# Altium PCB CH32X035F8U-R0.PcbDoc
Units mil, origin at the board's own origin, x right, y up, seen from the top; angles counter-clockwise.
Board outline 1850.39 x 1771.65 mil, 2 copper layers (Top Layer, Bottom Layer); 39 components, 35 nets, 161 pads, 318 vias.
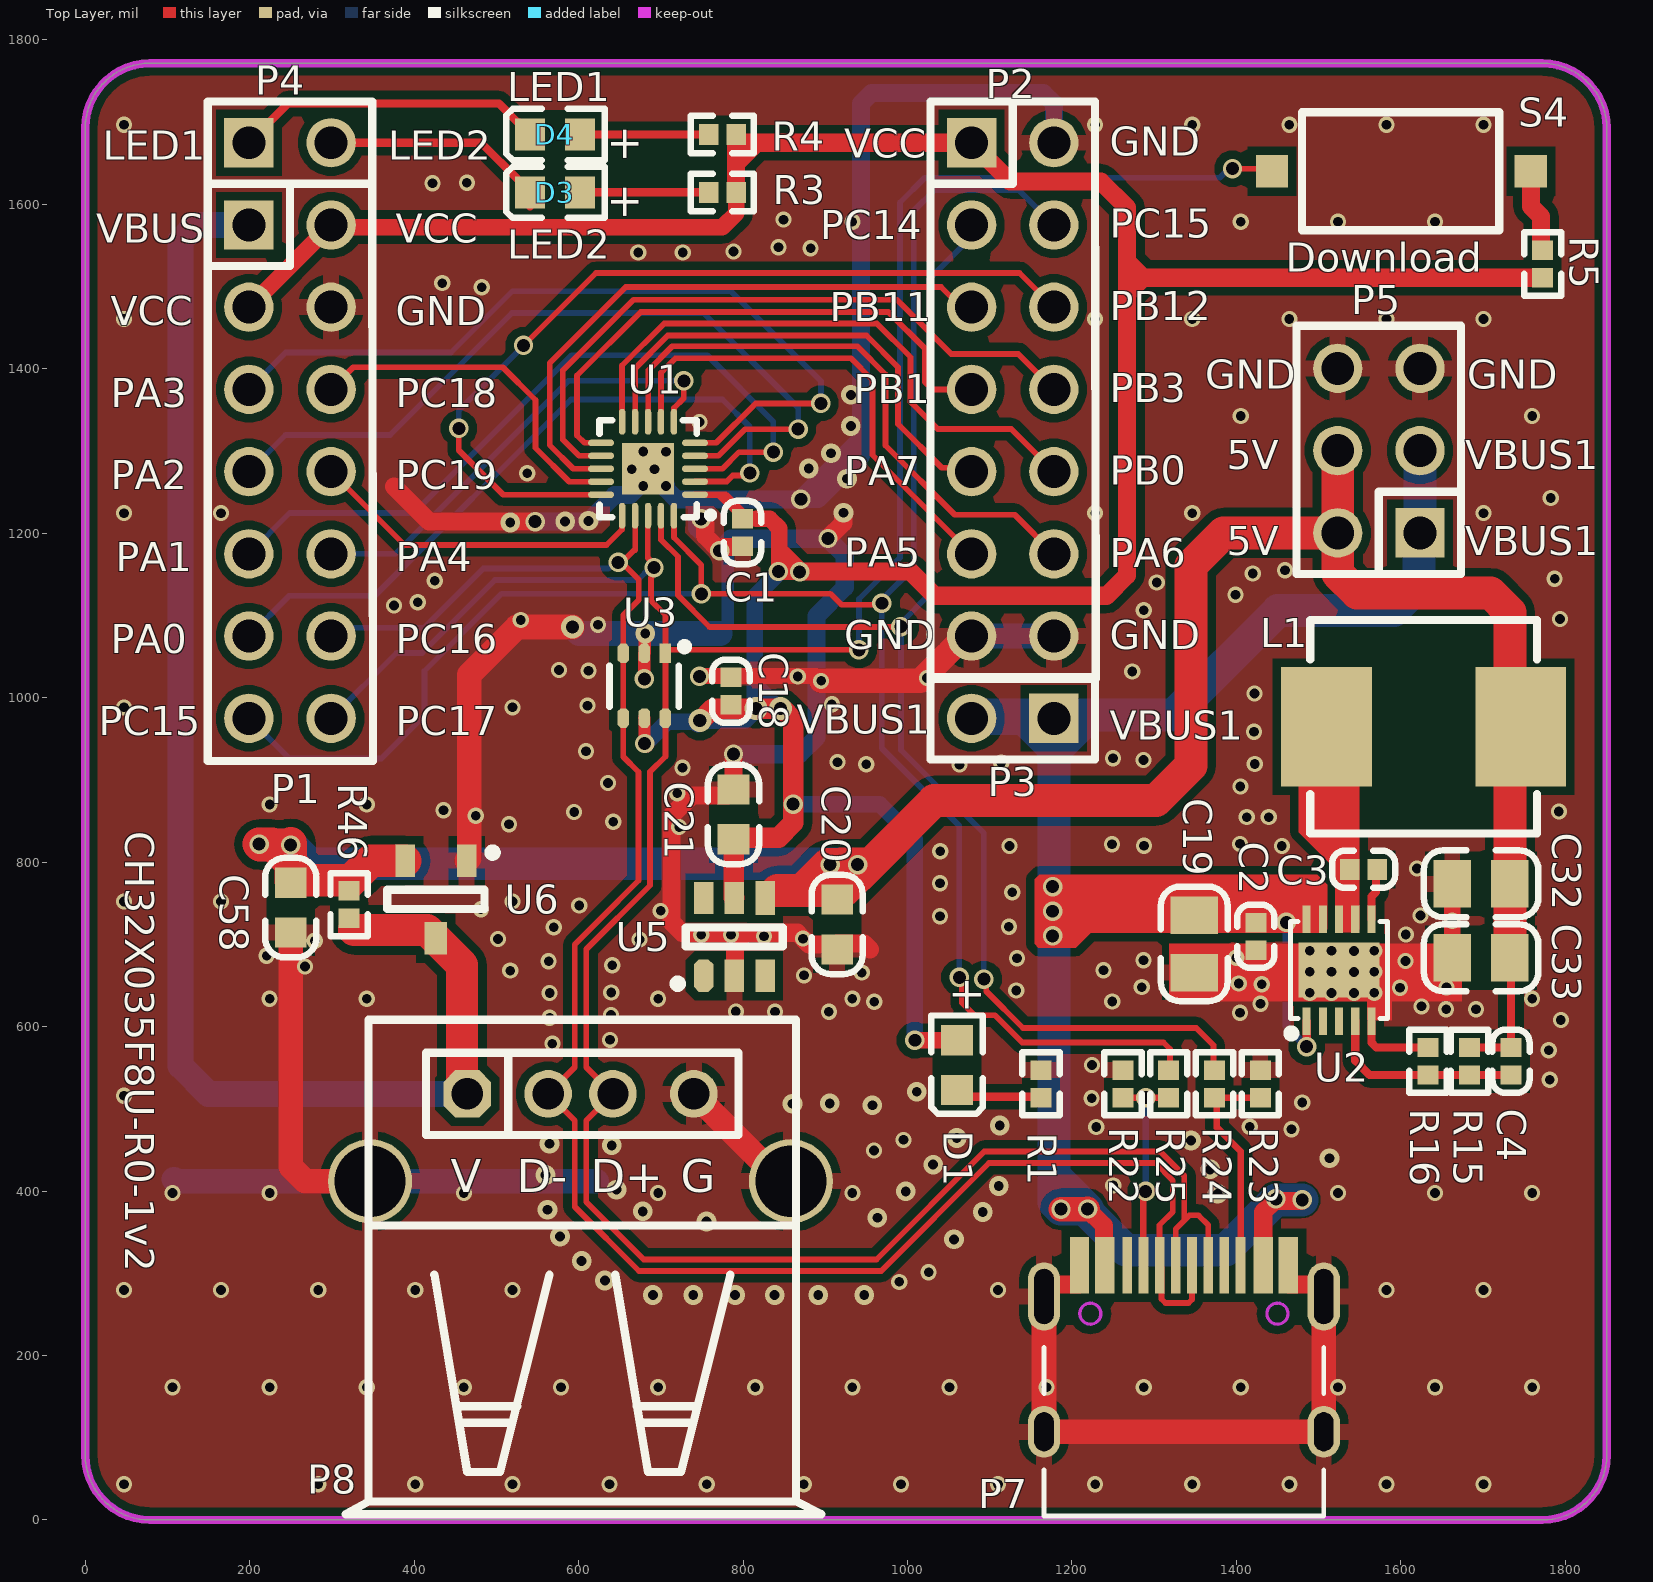
[diagram p0: Top Layer view]
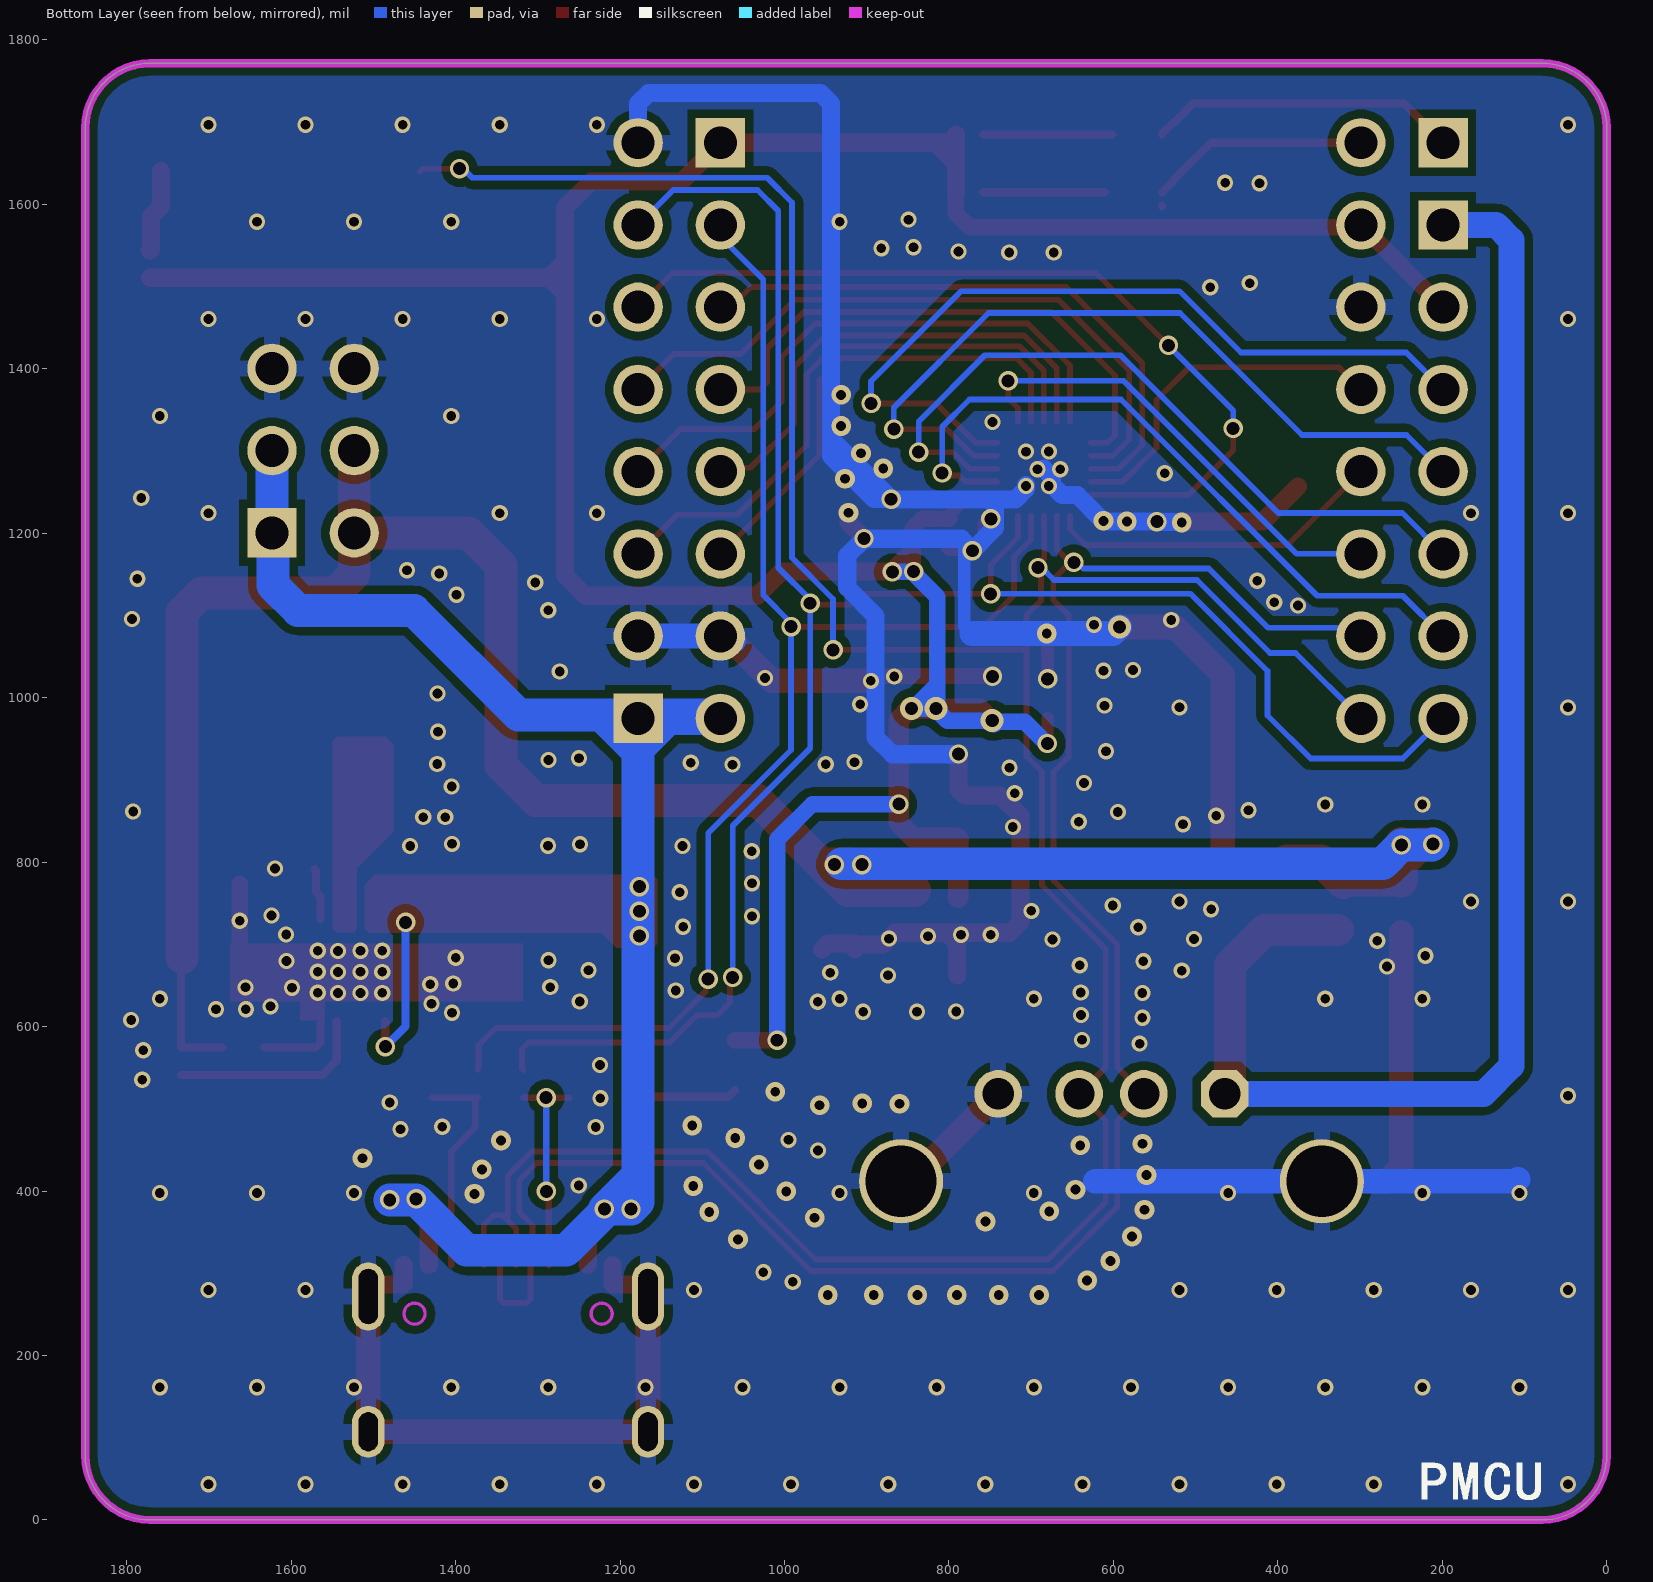
[diagram p1: Bottom Layer view, seen from below]

## Layer stack, top to bottom
Top Solder: solder mask 0.4, Solder Resist, Dk 3.5
Top Layer: signal copper 1.4
Dielectric1: dielectric 12.6, FR-4, Dk 4.8
Bottom Layer: signal copper 1.4
Bottom Solder: solder mask 0.4, Solder Resist, Dk 3.5

## Board outline
0,78.74 0,1692.91 cw(c78.74,1692.91) 78.74,1771.65 1771.65,1771.65 cw(c1771.65,1692.91) 1850.39,1692.91 1850.39,78.74 cw(c1771.65,78.74) 1771.65,0 78.74,0 cw(c78.74,78.74)

## Design rules (kind name [scope] priority, off if disabled: settings)
Clearance Clearance_1 [InPolygon] p1: gap=10 ignorepadtopadclearanceinfootprint=FALSE except(0: Arc-Hole Track-Hole SMDPad-Hole THPad-Hole Via-Hole Fill-Hole Poly-Hole Region-Hole Text-Hole)
Clearance [All] p2: gap=6 ignorepadtopadclearanceinfootprint=FALSE except(0: Arc-Hole Track-Hole SMDPad-Hole THPad-Hole Via-Hole Fill-Hole Poly-Hole Region-Hole Text-Hole)
ComponentClearance [All] p1 off: gap=10 collisioncheckmode=3 verticalgap=10 showdistances=FALSE
DiffPairsRouting [All] p1: maxlimit=10 minlimit=7 mostfreqgap=8 toplayer_minwidth=6 toplayer_maxwidth=15 toplayer_prefwidth=15 bottomlayer_minwidth=6 bottomlayer_maxwidth=15 bottomlayer_prefwidth=15 maxuncoupledlength=500
MinimumSolderMaskSliver [All] p1 off: minsoldermaskwidth=10
PolygonConnect PolygonConnect_1 [IsVia] p1: connectstyle=Direct reliefconductorwidth=10 reliefentries=4 polygonreliefangle="90 Angle" airgapwidth=10
PolygonConnect [All] p2: connectstyle=Relief reliefconductorwidth=20 reliefentries=4 polygonreliefangle="90 Angle" airgapwidth=10
RoutingVias [All] p1: holewidth=16 width=28 viastyle="Through Hole" minholewidth=11.81 minwidth=17.72 maxholewidth=28 maxwidth=50
SilkToSilkClearance [All] p1 off: silktosilkclearance=10
SilkToSolderMaskClearance [IsPad] p1 off: minsilkscreentomaskgap=10 clearancetoexposedcopper=TRUE
SolderMaskExpansion [All] p1: expansion=2 istentingtop=FALSE
Width [All] p1: maxlimit=100 minlimit=6 preferedwidth=10
25 further rules are at their usual default settings.

## Classes and differential pairs
differential pair NewDifferentialPair1: +PC17 -PC16

## Components (designator, comment, footprint, x,y, rotation, side; value= is the part's Value field where it differs from the comment)
C1 "0.1uF" 0402_C 799.3,1217.7 r0 top
C2 "NC(0.1uF)" 0402_C 1423.68,693.14 r180 top
C3 "NC(100nF)" 0402_C 1571.41,791.4 r270 top
C4 "NC(68pF)" 0402_C 1733.95,574.65 r0 top
C18 "0.1uF" 0402_C 785.24,1024.7 r0 top
C19 "NC(22uF/35V)" 0805_C 1348.71,665.62 r90 top
C20 "10uF" 0603_C 914.45,693.99 r90 top
C21 "10uF" 0603_C 788.4,888.48 r270 top
C32 "NC(22uF)" 0805_C 1662.54,773.73 r0 top
C33 "NC(22uF)" 0805_C 1662.54,683.73 r0 top
C58 "10uF" 0603_C 249.89,775.06 r270 top
D1 "RED" 0603+ 1060.26,583.43 r270 top
D3 "LED2" 0603+ 601.46,1614.6 r180 top
D4 "LED1" 0603+ 601.46,1685 r180 top
L1 "NC(4.7uH)" IND-SMD_L7.0-W6.6 1627.65,964.73 r0 top
P1 "Header 7X2" IDC14-2.54mm 199,1575 r0 top
P2 "Header 7X2" IDC14-2.54mm 1077.95,1675 r0 top
P3 "HEADER 2" SIP2-2.54mm 1177.95,975 r90 top
P4 "Header 2" SIP2-2.54mm 199,1675 r270 top
P5 "HEADER 3x2" IDC6-2.54mm 1623.23,1200.54 r90 top
P7 "TYPE-C" TYPE-C-Receptacle-2.0 1336.14,310 r0 top
P8 "USB_A" USBAF 464.51,518.31 r0 top
R1 "1K" 0402 1162.26,513.65 r90 top
R3 "1K" 0402 791.63,1614.6 r180 top
R4 "1K" 0402 791.63,1685 r180 top
R5 "4.7K" 0402 1772.46,1510.82 r90 top
R15 "NC(15K)" 0402 1683.45,541.18 r90 top
R16 "NC(4.7K)" 0402 1632.95,574.65 r270 top
R22 "5.1K" 0402 1261.97,513.65 r90 top
R23 "5.1K" 0402 1429.04,513.65 r90 top
R24 "0Ω" 0402 1373.35,547.11 r270 top
R25 "0Ω" 0402 1317.66,513.65 r90 top
R46 "NC(0Ω)" 0402 320.89,765.06 r270 top
S4 "Download" SMD_6.1x3.65x2.5mm-KEY 1758.21,1640.33 r180 top
U1 "CH32X035F8U6" QFN20_3X3 684.42,1278.5 r90 top
U2 "NC(CH2024Q)" DFN10_3X3 1524.85,668.74 r0 top
U3 "CH412K" SOT-363 705.57,1054.05 r180 top
U5 "CH2003K" SOT-23-6 751.94,662.03 r0 top
U6 "CH213" SOT-23-3 463.83,801.81 r180 top

## Footprints (in the part's own frame and the unit in brackets; to place one, negate y for a bottom-side part, rotate by r counter-clockwise, add the part's x,y. Pads: shape width x height; smd on the part's side, far side on the other; paste and mask are expansions set on the pad)
0402 [mm]
  rect 0.6x0.65 smd mask+0.051: 1(0,0) 2(0.85,0)
  silkscreen extent -0.55,-0.58 1.4,0.57
0402_C [mm]
  rect 0.65x0.6 smd mask+0.051: 1(0,0) 2(0,-0.85)
  silkscreen extent -0.58,-1.4 0.57,0.55
0603+ [mm]
  rect 0.93x0.98 smd: 1(0,0) 2(1.54,0)
  silkscreen extent -0.76,-0.79 2.27,0.79
0603_C [mm]
  rect 0.93x0.98 smd mask+0.051: 1(0,0) 2(1.54,0)
  silkscreen extent -0.76,-0.79 2.31,0.79
0805_C [mm]
  rect 1.16x1.47 smd mask+0.051: 1(0,0) 2(1.78,0)
  silkscreen extent -0.88,-1.04 2.66,1.03
DFN10_3X3 [mm]
  rect 2.5x1.7 smd mask+0.051: 0(0,0)
  rect 0.25x0.85 smd mask+0.051: 1(-1,-1.575) 2(-0.5,-1.575) 3(0,-1.575) 4(0.5,-1.575) 5(1,-1.575) 6(1,1.575) 7(0.5,1.575) 8(0,1.575) 9(-0.5,1.575) 10(-1,1.575)
  silkscreen extent -1.57,-2.05 1.5,1.5
IDC6-2.54mm [mil]
  rect 60x60 hole 40: 1(0,0)
  round 60 hole 40: 2(0,100) 3(100,0) 4(100,100) 5(200,0) 6(200,100)
  silkscreen extent -50,-50 252,150
IDC14-2.54mm [mil]
  rect 60x60 hole 40: 1(0,0)
  round 60 hole 40: 2(100,0) 3(0,-100) 4(100,-100) 5(0,-200) 6(100,-200) 7(0,-300) 8(100,-300) 9(0,-400) 10(100,-400) 11(0,-500) 12(100,-500) 13(0,-600) 14(100,-600)
  silkscreen extent -50,-652 151,50
IND-SMD_L7.0-W6.6 [mm]
  rect 2.8x3.7 smd: 1(-3,0) 2(3,0)
  silkscreen extent -3.5,-3.3 3.5,3.3
QFN20_3X3 [mm]
  rect 1.6x1.6 smd mask+0.051: 0(0,0)
  oval 0.2x0.8 smd mask+0.051: 1(-0.8,-1.451) 2(-0.4,-1.451) 3(0,-1.451) 4(0.4,-1.451) 5(0.8,-1.451) 11(0.8,1.451) 12(0.4,1.451) 13(0,1.451) 14(-0.4,1.451) 15(-0.8,1.451)
  oval 0.8x0.2 smd mask+0.051: 6(1.451,-0.8) 7(1.451,-0.4) 8(1.451,0) 9(1.451,0.4) 10(1.451,0.8) 16(-1.451,0.8) 17(-1.451,0.4) 18(-1.451,0) 19(-1.451,-0.4) 20(-1.451,-0.8)
  silkscreen extent -1.53,-2.03 1.5,1.5
SIP2-2.54mm [mil]
  rect 60x60 hole 40: 1(0,0)
  round 60 hole 40: 2(0,100)
  silkscreen extent -50,-50 50,150
SMD_6.1x3.65x2.5mm-KEY [mm]
  rect 1x1 smd: 1(0,0) 2(8,0)
  silkscreen extent 0.98,-1.83 7.08,1.83
SOT-23-3 [mm] "SOT-23-3"
  rect 0.6x1 smd: 1(0,0) 2(1.9,0)
  rect 0.7x1 smd: 3(0.95,2.4)
  silkscreen extent -0.93,-0.38 2.45,1.49
SOT-23-6 [mm] "SOT-23-6"
  oct 0.6x1 smd: 1(0,0)
  rect 0.6x1 smd: 2(0.95,0) 3(1.9,0) 5(0.95,2.4) 6(0,2.4)
  rect 0.6x1.04 smd: 4(1.9,2.4)
  silkscreen extent -0.93,-0.38 2.45,1.49
SOT-363 [mm]
  rect 0.35x0.6 smd mask+0.051: 1(0,0)
  oct 0.35x0.6 smd mask+0.051: 2(0.65,0) 3(1.3,0) 4(1.3,2) 5(0.65,2) 6(0,2)
  silkscreen extent -0.7,-0.31 1.73,1.65
TYPE-C-Receptacle-2.0 [mm]
  oval 1x1.6 hole 0.6 slot 1.2 at 90 deg: 0(-4.32,-5.15) 0(4.32,-5.15)
  oval 1x2.1 hole 0.6 slot 1.7 at 90 deg: 0(-4.32,-0.97) 0(4.32,-0.97)
  rect 0.6x1.75 smd mask+0.051: A1(-3.225,0) A4(-2.45,0) B1(3.225,0) B4(2.45,0)
  rect 0.3x1.75 smd mask+0.051: A5(-1.25,0) A6(-0.25,0) A7(0.25,0) A8(1.25,0) B5(1.75,0) B6(0.75,0) B7(-0.75,0) B8(-1.75,0)
  Keep-Out Layer circle w0.1: c-2.89,-1.5 r0.325
  Keep-Out Layer circle w0.1: c2.89,-1.5 r0.325
  silkscreen extent -4.32,-7.75 4.32,-2.55
USBAF [mm]
  round 2.6 hole 2.2: 0(-3,-2.7) 0(10,-2.7)
  oct 1.473x1.473 hole 0.965: 1(0,0)
  round 1.473 hole 0.965: 2(2.5,0) 3(4.5,0) 4(7,0)
  silkscreen extent -3.75,-12.99 10.95,2.29

## Part data
C1 C18: library part Cap, "Capacitor"
C2 C20 C21 C58: library part CAP, "Capacitor"
C3: library part "0603 1uF (105) 10% 50V", "贴片电容", Package=0603, SuppliersPartNumber=C15849, ComponentLink1Description=供应商链接, ComponentLink1URL=http://www.szlcsc.com/product/details_16531.html, Supplier=LC
C4 C19 C32 C33: library part "0603 100nF (104) 10% 50V", "贴片电容", Package=0603, SuppliersPartNumber=C14663, ComponentLink1Description=供应商链接, ComponentLink1URL=http://www.szlcsc.com/product/details_15331.html, Supplier=LC
D1 D3 D4: library part LED0, "Typical INFRARED GaAs LED", LatestRevisionDate=08-Jul-2005, LatestRevisionNote="Mech Layer 1 removed.", PackageReference=LED-0, Published=8-Jun-2000, Publisher="Altium Limited"
  D1: PackageDescription="LED; 2 Leads"
L1: library part INDUCTOR
P1 P2: "Header, 7-Pin, Dual row", LatestRevisionDate=17-Jul-2002, LatestRevisionNote="Re-released for DXP Platform.", Publisher="Altium Limited"
P3 P4: "Header, 2-Pin"
  P4: LatestRevisionDate=17-Jul-2002, LatestRevisionNote="Re-released for DXP Platform.", Publisher="Altium Limited"
P5: "Header, 3-Pin, Dual row"
P7: library part TYPE-C1
P8: library part USB, "USB Port"
R1 R15 R16 R46: library part RES
R3 R4: library part "Res Semi", "Semiconductor Resistor", LatestRevisionDate=17-Jul-2002, LatestRevisionNote="Re-released for DXP Platform.", PackageReference=AXIAL-0.5, Published=8-Jun-2000, Publisher="Altium Limited"
R5 R22 R23 R24 R25: library part Res2, "Resistor"
S4: library part KEY1
U1: "RISC-V MCU with USB/PD/ADC/SPI/I2C/UART/OA"
U2: library part CH2024Q, "Step-Down DC-DC Converter, 28V input, FB 1.2V, 3A output"
U3: "Qaud ESD protect, high speed"
U5: "Step-Down DC-DC Converter, 5V input, FB 0.6V, 800mA output, with LDO 3.3V * 200mA"
U6: library part CH213E, "Ideal Diode 5V*1A"

## Via types
v1: diameter 19.68, hole 11.81, Top Layer to Bottom Layer, tented both sides, 228 vias
v2: diameter 23.62, hole 15.75, Top Layer to Bottom Layer, tented both sides, 44 vias
v3: diameter 24, hole 12, Top Layer to Bottom Layer, tented both sides, 42 vias
v4: diameter 28, hole 16, Top Layer to Bottom Layer, tented both sides, 4 vias

## Nets (pads, with @x,y where several pads share a name; then routed paths per layer and width w, separated by ;. In a path a pad name is that pad's centre, name@x,y a point inside that pad or via, vN(x,y) a via of type N, cw(c..) or ccw(c..) an arc to the next point about the centre after c; other vN are vias at no path point)
3V3: C1.1 C18.2 C21.2 D1.1 P1.2 P1.3 P2.1 R3.1 R4.1 R5.1 U1.1 U3.5 U5.5 | length 4350.5
  Top Layer w8: C1.1 798.32,1217.7 790.51,1225.51 790.51,1226.49 770.06,1246.95 ; 815.92,1217.7 808.37,1217.7 779.12,1246.95 770.06,1246.95 ; 770.06,1246.95 769.99,1247.01 U1.1 741.61,1246.95 770.06,1246.95
  Top Layer w15: U3.5 680.14,975.15 680.14,944.55 v2(680.3,944.4)
  Top Layer w20: P1.3 P1.2 301.62,1572.38 774.94,1572.38 791.63,1589.08 R3.1 ; v2(680.3,944.4) v2@681.83,942.87 ; C1.1 C1.1@808.37,1217.7 ; 815.92,1217.7 832.54,1217.7 844.26,1205.98 844.26,1180.12 ; v4(845.69,986.83) v4@846.48,987.63 ; v2(1009.02,583.43) D1.1 ; 844.26,1180.12 870.89,1153.49 870.89,1153.04 870.62,1153.31 845.21,1153.31 844.26,1154.27 844.26,1180.12
  Top Layer w22: R3.1 791.63,1649.8 ; R4.1 791.63,1649.8 ; R4.1@800.65,1675 816.83,1675 ; 822.15,1675 816.83,1675 ; v2@870.89,1153.49 1003.81,1153.49 1033.31,1124 1242,1124 1267,1149 1267,1490.94 ; R5.1@1771.48,1510.82 1286.88,1510.82 ; 791.63,1649.8 816.83,1675 ; 816.83,1675 P2.1 1124.95,1628 1235.03,1628 1267,1596.03 1267,1530.7 ; 1267,1490.94 1267,1510.82 ; 1267,1490.94 1286.88,1510.82 ; 1267,1510.82 1267,1530.7 ; 1267,1510.82 1286.88,1510.82 ; 1267,1530.7 1286.88,1510.82
  Top Layer w25: v4(747.36,972.19) 748.44,972.19 763.09,986.83 v4(815.72,986.83) v4(845.69,986.83) 847.69,986.83 861.2,973.32 861.2,847.92 843.24,829.95 790.5,829.95 C21.2 788.87,827.38 788.87,756.99 U5.5
  Bottom Layer w20: v2(680.3,944.4) 681.28,944.4 707.54,970.66 745.83,970.66 v4(747.36,972.19) 802.28,972.19 814,983.9 814,1016.35 ; v4(815.72,986.83) v4@843.52,986.83 ; v4(845.69,986.83) v4@843.52,986.83 ; v2(860.87,870.54) 966.19,870.54 1009.02,827.71 v2(1009.02,583.43) ; v2@870.89,1153.04 v2(868.89,1153.04) 844.42,1153.04 814,1122.63 814,1016.35 ; 814,1016.35 v4@843.52,986.83
  Bottom Layer w25: v4@745.57,970.4 v4@745.83,970.66
  other v2: 842.95,1153.57
+5V: C4.1 C20.2 C32.2 C33.2 C58.1 L1.2 P5.2 P5.4 R15.2 R46.1 U5.4 U6.2 | length 3156.8
  Top Layer w10: R15.2 C4.1 1733.95,682.4 C33.2
  Top Layer w40: C58.1@249.89,777.06 C58.1@249.89,778.06 ; v2@249.89,822.79 v2@249.89,820.79 ; R46.1@320.55,775.06 347.3,801.81 U6.2 ; 320.55,778.06 270.75,778.06 ; 842.06,765.43 871.47,765.43 ; v2(939.43,797.13) 919.93,797.13 ; P5.2@1523.23,1196.71 1523.23,1150.8 1546.66,1127.37 1709.18,1127.37 1732.61,1103.94 C32.2 C33.2 ; P5.4 P5.2 1384.53,1200.54 1344.6,1160.61 1344.6,917.33 1302.14,874.87 1032.2,874.87 954.45,797.11 ; 227.91,820.9 249.89,798.92 ; 227.91,820.9 226.9,821.91 v2(211.41,821.91) 212.42,820.9 227.91,820.9 ; 227.91,820.9 v2(249.77,820.9) v2@249.89,820.79 ; C58.1@249.89,778.06 270.75,778.06 ; C58.1@249.89,778.06 249.89,798.92 ; 249.89,798.92 270.75,778.06 ; 249.89,798.92 v2@249.89,820.79 ; 871.47,765.43 903.17,797.13 919.93,797.13 ; 871.47,765.43 C20.2@900.88,765.43 ; C20.2@900.88,765.43 919.93,784.48 919.93,797.13 ; C20.2@900.88,765.43 922.76,765.43 954.45,797.11 ; 919.93,797.13 919.93,797.95 953.24,797.95 953.43,798.13 954.45,797.11
  Bottom Layer w40: v2(211.41,821.91) 212.42,820.9 v2(249.77,820.9) 272.54,798.13 v2@930.49,798.13
  other v2: 905.93,796.95
CC1: P2.3 R24.1 U1.19 | length 1737.5
  Top Layer w7: U1.19 700.17,1192.22 720.76,1171.62 720.76,1124.53 759.16,1086.14 991.66,1086.14 v2(991.95,1086.43) ; v2(1092.81,657.79) 1095.67,654.93 1095.67,643.09 1140.47,598.29 1351.17,598.29 1372.12,577.34 1372.12,548.34 R24.1
  Bottom Layer w7: P2.3 1077.95,1560.66 1025.7,1508.41 1025.7,1124.69 991.95,1090.93 991.95,936.5 1092.81,835.64 v2(1092.81,657.79)
CC2: P1.13 P2.4 R25.2 U1.20 | length 2540.9
  Top Layer w7: U1.20 715.91,1194.86 749.2,1161.57 v2(749.2,1126.24) ; v2@749.52,1126.56 906.49,1126.56 919.88,1113.17 966.96,1113.17 v2(968.72,1114.93) ; v2(1062.99,660) 1066.17,656.82 1066.17,629.15 1081.46,613.86 1106.51,613.86 1139.59,580.79 1311.43,580.79 1319.3,572.91 1319.3,548.75 R25.2
  Bottom Layer w7: P1.13 248,926 360,926 412.5,978.5 412.5,1032.69 506.37,1126.56 748.87,1126.56 v2(749.2,1126.24) ; v2(1062.99,660) 1062.99,844.24 968.72,938.5 968.72,1119.43 1007.48,1158.19 1007.48,1592.3 1032.74,1617.56 1135.4,1617.56 P2.4
FB: C4.2 R15.1 R16.2 U2.4 | length 244.7
  Top Layer w10: U2.4 1544.61,606.65 1544.61,558.56 1561.99,541.18 R15.1 C4.2
GND: C1.2 C2.1 C18.1 C19.1 C20.1 C21.1 C32.1 C33.1 C58.2 P1.4 P2.2 P2.13 P2.14 P5.5 P5.6 P7.0 P7.A1 P7.B1 P8.0 P8.4 R1.2 R16.1 R22.2 R23.2 U1.0 U2.0 U2.5 U3.2 U5.2 U6.1 | length 6045.2
  Top Layer w10: U2.5 1564.22,580.51 1570.08,574.65 R16.1
  Top Layer w15: v2@679.98,1026.05 U3.2 680.48,1054.55 680.48,1077.55 v3(680.98,1078.05)
  Top Layer w20: v2(747,1025.94) 747.5,1026.44 889.08,1026.44 v1(894.97,1020.56) ; C33.1 C32.1
  Top Layer w22: P1.4@305.22,1468.78 P1.4@305.22,1473.14 ; 375.66,1256.71 418.1,1214.27 v2(547.11,1214.27) ; v2(749.03,1217.54) 749.34,1217.23 749.34,1215.72 754.05,1211.01 754.05,1196.56 v2@771.28,1179.33 ; v2(771.42,1178.76) 771.42,1179.19 v2@771.28,1179.33 ; v2(788.4,931.58) C21.1 781.09,881.17 737.72,881.17 713.1,856.56 713.1,727.07 725.99,714.18 785.39,714.18 792.95,714.18 803.04,714.18 ; U5.2 790.15,662.84 790.15,701.29 792.95,704.09 803.04,714.18 ; C1.2 798.49,1183.42 775.37,1183.42 v2@771.28,1179.33 ; v2(903.3,1193.7) 903.3,1194.14 921.88,1212.72 921.88,1224.6 v3(922.26,1224.98) ; C20.1 908.5,699.94 880.13,699.94 865.89,714.18 803.04,714.18 ; C20.1@914.45,701.3 947.14,701.3 954.45,693.99 ; P7.0@1166.06,271.81 1166.06,278.53 1174.09,286.55 1208.36,286.55 1209.17,287.36 P7.A1 ; P7.B1 1463.11,287.36 1463.92,286.55 1498.2,286.55 1506.22,278.53 P7.0@1506.22,271.81
  Top Layer w30: C58.2 249.89,429.58 267.46,412.01 P8.0@346.4,412.01 ; U6.1 467.02,805 467.02,1027.98 525.17,1086.13 v4(592.38,1086.13) ; P8.4 846.4,412.01 P8.0@858.21,412.01 ; v1(894.97,1020.56) 1015.39,1020.56 1069.84,1075 P2.13 ; P7.0@1166.06,271.81 1166.06,107.24 1506.22,107.24 P7.0@1506.22,271.81
  Bottom Layer w15: 772.35,1078.05 781.53,1087.22 781.53,1189.31
  Bottom Layer w22: v3(516.83,1213) 517.37,1213 518.33,1213.96 546.8,1213.96 v2(547.11,1214.27) v3(583.65,1214.27) 611.89,1214.27 611.89,1214.57 643.93,1246.61 662.61,1246.61 674.61,1258.61 674.61,1268.7 v1@684.42,1278.5 ; v1@706.28,1258.41 706.28,1254.17 719.16,1241.29 743.82,1241.29 ; v2@749.03,1216.65 v2(749.03,1217.54) ; v2(771.42,1178.76) v2@771.42,1179.19 ; v2(788.4,931.58) 788.71,931.27 868.61,931.27 889.25,951.91 889.25,1099.55 923.69,1133.99 923.69,1172.87 903.3,1193.26 v2(903.3,1193.7) 902.99,1193.39 784.91,1193.39 781.53,1190.02 781.53,1189.31 v2@771.42,1179.19 ; P2.2 1177.95,1722.46 1165.07,1735.35 956.25,1735.35 943.37,1722.46 943.37,1314.47 ; 743.82,1241.29 870.18,1241.29 v2(870.32,1241.42) v2@870.63,1241.74 ; 743.82,1241.29 743.82,1206.79 v2@771.42,1179.19 ; v2@870.63,1241.74 943.37,1314.47 ; v2@870.63,1241.74 891.14,1241.74 943.37,1293.96 943.37,1314.47
  Bottom Layer w30: 108,414.46 110.45,412.01 346.4,412.01 621.99,412.01 ; v4(592.38,1086.13) 600.47,1078.05 v3(680.98,1078.05) 772.35,1078.05 ; P2.13@1061.93,1069.26 1072.21,1069.26 P2.13 P2.14
  other v1: 47.09,43.42 283.31,43.42 401.42,43.42 519.53,43.42 637.64,43.42 755.75,43.42 873.86,43.42 991.97,43.42 1110.08,43.42 1228.19,43.42 1346.3,43.42 1464.41,43.42 1582.52,43.42 1700.63,43.42 106.14,161.53 224.25,161.53 342.36,161.53 460.47,161.53 578.58,161.53 696.69,161.53 814.8,161.53 932.91,161.53 1051.02,161.53 1169.13,161.53 1287.24,161.53 1405.35,161.53 1523.46,161.53 1641.57,161.53 1759.68,161.53 47.09,279.64 165.2,279.64 283.31,279.64 401.42,279.64 519.53,279.64 1110.08,279.64 1582.52,279.64 1700.63,279.64 989.86,289.57 1025.69,301.32 106.14,397.76 224.25,397.76 460.47,397.76 696.69,397.76 932.91,397.76 1523.46,397.76 1641.57,397.76 1759.68,397.76 1250.14,406.71 959.31,449.37 995.14,462.3 1467.04,475.18 1229.48,477.91 1416.19,478.19 1479.97,507.67 1223.91,512.98 47.09,515.87 1780.99,535.45 1224.47,553.42 1779.98,571.21 568.1,579.34 638.08,583.89 1794.59,607.99 564.79,610.81 639.32,614.12 1404.41,616.98 791.27,618.47 838.76,618.02 904.35,618.02 1655.05,621.13 1691.52,621.13 1625.12,624.66 1429.18,627.89 959.53,630.23 1249.07,630.61 224.25,633.98 342.36,633.98 696.69,633.98 932.91,633.98 1759.68,633.98 564.79,641.04 639.74,641.45 1489.29,641.05 1515.75,641.05 1543.15,640.86 1567.71,641.24 1132.31,643.93 1599.09,647.23 1284.82,648.04 1655.56,647.8 1402.82,652.44 1430.77,651.53 874.04,662.35 944.45,665.68 1543.15,666.44 1489.29,666.63 1515.75,666.63 1567.71,666.82 516.79,668.12 1238.34,668.59 267.14,673.19 640.98,674.58 563.54,679.55 1605.7,679.92 1287.06,680.66 1133.07,683.11 1399.86,683.81 220.6,686.12 1489.29,692.21 1515.75,692.2 1543.15,692.02 1567.71,692.39 279.18,704.43 674.11,706.05 501.95,706.69 873.01,707.06 825.44,709.96 749.18,711.78 785.39,711.65 1606.08,712.05 569.76,720.96 1123.29,721.54 1662.54,728.73 1039.44,734.28 1623.84,735.1 699.78,740.83 481.14,742.74 600.81,747.46 47.09,752.09 165.2,752.09 519.53,752.09 1127.34,763.34 1039.44,774.39 1619.59,792.42 1039.72,813.36 1123.96,819.65 1287.5,820.11 1455.3,819.63 1248.62,821.89 1404.5,822.31 722.26,842.71 515.47,846.17 642.13,849.14 1412.52,854.84 1439.26,854.84 474.9,856.43 594.52,860.98 1792.16,861.78 435.66,863.11 224.25,870.2 342.36,870.2 719.99,883.91 1404.82,892.13 635.71,896.38 726.42,914.9 949.78,919.11 1063.31,918.65 1422.42,919.51 1113.94,920.87 914.97,921.7 1287,924.4 1249.85,926.35 608.87,934.93 1421.44,958.62 47.09,988.31 519.53,988.31 610.73,990.39 908.01,992.15 1421.93,1005.06 1023.76,1024.03 866.58,1025.86 1273.31,1031.95 611.98,1032.88 576.23,1033.86 623.64,1088.71 529.64,1094.51 1793.43,1095.86 1287.24,1106.42 375.46,1112.2 404.39,1116.24 1398.95,1125.32 1303.1,1140.1 425.03,1142.35 1787.03,1144.66 1419.97,1151.23 1459.08,1155.14 47.09,1224.53 165.2,1224.53 1228.19,1224.53 1346.3,1224.53 1700.63,1224.53 1782.23,1243.06 706.28,1257.41 678.44,1257.61 537.59,1273.06 664.53,1277.98 692.36,1277.98 706.28,1299.36 678.44,1299.56 747.05,1335.29 1405.35,1342.64 1759.68,1342.64 47.09,1460.75 1228.19,1460.75 1346.3,1460.75 1464.41,1460.75 1582.52,1460.75 1700.63,1460.75 482.28,1499.18 434.11,1504.25 726.69,1541.48 672.57,1541.61 788.3,1542.85 882.18,1546.73 843.17,1547.84 932.91,1578.86 1405.35,1578.86 1523.46,1578.86 1641.57,1578.86 849.31,1581.49 422.18,1625.64 464.1,1626.32 47.09,1696.97 1228.19,1696.97 1346.3,1696.97 1464.41,1696.97 1582.52,1696.97 1700.63,1696.97
  other v2: 679.98,1023.05
  other v3: 690.32,273.5 739.35,273.5 790.35,273.5 838.39,273.5 891.37,273.5 947.33,273.5 631.89,291.18 603.67,314.95 1056.64,341.32 577.42,344.66 755.66,363.11 963.34,367.62 677.94,375.33 1091.58,374.61 562.07,377.34 1376.91,396.61 997.86,399.68 646.16,401.73 1110.96,406.26 559.59,419.44 1368.03,426.43 1031.16,432.16 1513.11,440.02 640.26,455.67 564.55,457.57 1344.88,461.63 1059.93,464.63 1112.13,479.84 957.25,504.39 860.1,506.16 905.44,506.74 1011.25,520.81 611.89,1215.11 926.4,1266.31 879.97,1278.74 907.02,1297.38 931.06,1330.46 931.06,1368.37
LED1: D4.2 P4.1 | length 377.8
  Top Layer w10: P4.1 246.68,1722.68 503.15,1722.68 526.54,1699.29 527.52,1699.29 540.83,1685.98 D4.2
LED2: D3.2 P4.2 | length 268.4
  Top Layer w10: P4.2 481.41,1675 527.52,1628.89 527.52,1627.9 D3.2 ; D3.2@540.83,1597.6 D3.2@540.83,1598.58
NetC3_1: C3.1 U2.6 | length 63.6
  Top Layer w10: U2.6 1564.3,730.82 1564.3,758.22 1569.94,763.86 1569.94,789.93 C3.1
NetC3_2: C3.2 L1.1 U2.7 U2.8
NetD1_2: D1.2 R1.1 | length 105.8
  Top Layer w10: D1.2 1068.42,514.64 1161.27,514.64 R1.1
NetD3_1: D3.1 R3.2 | length 147.7
  Top Layer w10: D3.1@610.42,1614.77 R3.2@758.17,1614.77
NetD4_1: D4.1 R4.2 | length 156.7
  Top Layer w10: D4.1 R4.2
NetP7_A5: P7.A5 R22.1 R25.1 | length 260.5
  Top Layer w8: R22.1 v2(1289.81,513.65) R25.1 ; P7.A5 1286.93,396.97 v2(1289.71,399.75)
  Bottom Layer w8: v2(1289.71,399.75) 1289.76,399.81 v2(1289.81,513.65) v2(1289.81,513.65)
NetP7_B5: P7.B5 R23.1 R24.2 | length 269.3
  Top Layer w8: R24.2 R23.1 ; R24.2@1376.26,511.72 1376.26,477.26 1405.04,448.49 P7.B5
NetR5_2: R5.2 S4.1 | length 102.5
  Top Layer w22: S4.1 1758.21,1597.67 1770.67,1585.21 1770.67,1545.1 1771.48,1544.29 R5.2
PA0: P1.11 U1.2 | length 869.7
  Top Layer w7: U1.2 741.72,1262.92 780.09,1262.92 787.35,1270.18 805.09,1270.18 v2(808.27,1273.36)
  Bottom Layer w7: P1.11 248.13,1124.13 352.13,1124.13 590.86,1362.86 775.09,1362.86 808.27,1329.69 v2(808.27,1273.36)
PA1: P1.9 U1.3 | length 912.1
  Top Layer w7: U1.3 774.92,1278.5 795.14,1298.72 v2(836.82,1298.72)
  Bottom Layer w7: P1.9 248.55,1224.55 399.55,1224.55 591.43,1416.43 756.51,1416.43 836.82,1336.12 v2(836.82,1298.72)
PA2: P1.7 U1.4 | length 960.8
  Top Layer w7: U1.4 770.06,1294.25 802.43,1326.62 v2(867.03,1326.62)
  Bottom Layer w7: P1.7 243.5,1319.5 370.58,1319.5 519.11,1468.03 751.81,1468.03 867.03,1352.82 v2(867.03,1326.62)
PA3: P1.5 U1.5 | length 990.5
  Top Layer w7: U1.5 767.42,1310 815.41,1357.99 v2(894.7,1357.99)
  Bottom Layer w7: P1.5 243.89,1419.89 444.91,1419.89 519.54,1494.52 785.04,1494.52 894.7,1384.85 v2(894.7,1357.99)
PA4: P1.10 U1.6 | length 570.8
  Top Layer w7: U1.6 716.08,1335.8 716.08,1352.53 727.93,1364.38 v2(727.93,1385.39)
  Bottom Layer w7: P1.10 377,1175 587.39,1385.39 v2(727.93,1385.39)
PA5: P2.11 U1.7 | length 596.6
  Top Layer w7: U1.7 700.17,1395.35 717.67,1412.86 931.11,1412.86 957.57,1386.4 957.57,1295.39 P2.11
PA6: P2.12 U1.8 | length 723.4
  Top Layer w7: U1.8 684.58,1335.8 684.58,1398.16 713.91,1427.49 939.08,1427.49 973.29,1393.28 973.29,1306.72 1057.37,1222.64 1130.32,1222.64 P2.12
PA7: P2.9 U1.9 | length 599.8
  Top Layer w7: U1.9 668.84,1335.8 668.84,1400.8 708.53,1440.49 950.06,1440.49 988.52,1402.02 988.52,1332.87 1041.55,1279.84 1073.11,1279.84 P2.9
PB0: P2.10 U1.10 | length 721.1
  Top Layer w7: U1.10 652.92,1404.08 704.12,1455.28 962.6,1455.28 1003.62,1414.26 1003.62,1360.02 1036.75,1326.9 1126.06,1326.9 P2.10
PB1: P2.7 U1.11 | length 680.5
  Top Layer w7: U1.11 607.18,1310.01 598.13,1319.06 598.13,1391.88 675.49,1469.24 976.7,1469.24 1020.99,1424.96 1020.99,1384.28 1030.27,1375 P2.7
PB3: P2.8 U1.12 | length 816.9
  Top Layer w7: U1.12 600.36,1294.26 580.84,1313.77 580.84,1398.2 666.82,1484.18 987.26,1484.18 1053.28,1418.16 1134.79,1418.16 P2.8
PB11: P2.5 U1.13 | length 735.8
  Top Layer w7: U1.13 593.54,1278.51 564.76,1307.29 564.76,1406.9 657.4,1499.54 1040.9,1499.54 1065.44,1475 P2.5
PB12: P2.6 U1.15 | length 1051.5
  Top Layer w7: v2(454.33,1327.54) 454.33,1301.05 508.37,1247.02 U1.15 ; v2(532.93,1428.55) 621.03,1516.64 1136.31,1516.64 P2.6
  Bottom Layer w7: v2(454.33,1327.54) 454.33,1349.37 v2@531.47,1426.51
PC16: P1.12 P7.A7 P7.B7 P8.2 U1.17 U3.3 U3.4 | length 2378.6
  Top Layer w7: v2(648.02,1164.56) v2@652.51,1164.56 ; U1.17 668.84,1221.2 668.84,1208.77 668.88,1208.73 668.88,1179.81 667.77,1179.81 v2@652.51,1164.56 ; P7.A7 1345.98,268.06 1341.88,263.96 1313.71,263.96 1309.02,268.64 1309.02,307.59 P7.B7 1306.61,358.59 1322.58,374.56 1322.58,412.97 1301.53,434.02 1099.27,434.02 968.19,302.94 673.35,302.94 595.31,380.99 595.31,485.94 P8.2 595.31,550.68 595.31,699.95 624.15,728.79 672.98,777.62 672.98,909.64 654.39,928.23 U3.4 U3.3 654.39,1100.22 673.16,1119 673.16,1143.91 v2@652.51,1164.56
  Bottom Layer w7: P1.12 309.14,1085.14 411.81,1085.14 483.91,1157.25 636.21,1157.25 643.52,1164.56 v2(648.02,1164.56)
PC17: P1.14 P7.A6 P7.B6 P8.3 S4.2 U1.18 U3.1 U3.6 | length 3683.7
  Top Layer w7: U1.18 684.25,1221.2 684.25,1208.77 684.21,1208.73 684.21,1170.2 688.07,1166.33 691.73,1162.68 v2(691.73,1158.18) 688.55,1155 688.55,1146.17 688.07,1145.7 688.07,1118.01 705.57,1100.51 U3.1 U3.6 705.57,928.53 686.98,909.94 686.98,771.82 609.31,694.15 609.31,550.68 P8.3 609.31,485.94 609.31,386.79 679.15,316.94 962.39,316.94 1093.47,448.02 1307.33,448.02 1336.58,418.77 1336.58,379.01 1336.58,364.3 ; U3.1@705.57,1054.9 708.96,1058.29 v2(940.93,1058.29) ; P7.A6 1326.3,354.02 1336.58,364.3 ; P7.B6 1365.67,358.59 1353.78,370.48 1345.12,370.48 1342.76,370.48 1336.58,364.3 ; v2(1395.29,1643.46) 1440.11,1643.46 S4.2
  Bottom Layer w7: P1.14 378.48,1054.48 409.43,1054.48 498.2,1143.25 672.29,1143.25 687.23,1158.18 696.22,1158.18 v2@699.4,1161.36 ; v2(940.93,1058.29) 940.93,1120.21 990.93,1170.21 990.93,1602.2 1021.08,1632.35 1379.67,1632.35 1390.79,1643.46 v2(1395.29,1643.46)
PC18: P1.6 U1.14 | length 431.2
  Top Layer w7: P1.6 325.87,1401.87 507.87,1401.87 547.47,1362.27 547.47,1303.91 588.62,1262.76 U1.14
PC19: P1.8 U1.16 | length 415.2
  Top Layer w7: P1.8 388.13,1185.87 633.95,1185.87 652.75,1204.67 652.75,1221.2 U1.16
VBUS: P1.1 P8.1 R46.2 U6.3 | length 1765.6
  Top Layer w39.37: 327.34,717.56 415.55,717.56 458.17,674.95 458.17,524.65 P8.1
  Bottom Layer w31.5: P1.1 134.33,1575 115.88,1556.55 115.88,552.12 149.69,518.31 P8.1
VBUS1: C2.2 C19.2 P3.1 P3.2 P5.1 P5.3 P7.A4 P7.B4 U2.1 U2.9 U2.10 | length 2622.2
  Top Layer w10: v2(1460.79,726.78) 1460.79,734.39 v2@1460.79,734.51 ; v2(1485.48,575.7) U2.1
  Top Layer w22: v2@1218.97,377.75 1238.87,357.84 1238.87,310.81 P7.A4 ; P7.B4 1432.6,374.37 v2@1446.4,388.17 ; v2(1448.03,390.46) 1448.03,389.81 v2@1446.4,388.17 ; v2(1480.11,389.32) 1478.96,388.17 v2@1446.4,388.17
  Top Layer w30: v2@1186.68,377.75 1218.97,377.75 v2(1218.97,378.18)
  Top Layer w40: 1277.39,757.82 1300.82,734.39 1460.79,734.39 1471.71,734.39
  Bottom Layer w10: v2(1460.79,726.78) 1460.79,600.39 v2(1485.48,575.7)
  Bottom Layer w40: v2(1218.97,378.18) 1177.95,419.19 ; v2(1480.11,389.32) 1448.03,389.32 1386.75,328.04 1265.44,328.04 1215.51,377.97 v2(1186.68,377.97) 1177.95,386.7 1177.95,419.19 ; P5.3 P5.1 1622.13,1199.45 1622.13,1136.78 1591.52,1106.17 1450.78,1106.17 1323.44,978.83 1222.39,978.83 ; 1141.41,975 1177.95,938.46 ; 1141.41,975 P3.1 1177.95,938.46 ; 1141.41,975 P3.2 1081.78,978.83 1222.39,978.83 ; 1177.95,419.19 1177.95,934.39 ; 1177.95,934.39 1222.39,978.83 ; 1177.95,934.39 1177.95,938.46
  other v2: 1176.51,710.46 1176.51,740.36 1176.51,770.26
pads on no net: P7.A8 P7.B8 U2.2 U2.3 U5.1 U5.3 U5.6

## Polygon pours and split planes (outlines as drawn)
GND on Bottom Layer "GND" (solid, remove dead copper, pour order 1): 0,78.74 0,1692.91 cw(c78.74,1692.91) 78.74,1771.65 1771.65,1771.65 cw(c1771.65,1692.91) 1850.39,1692.91 1850.39,78.74 cw(c1771.65,78.74) 1771.65,0 78.74,0 cw(c78.74,78.74)
GND on Top Layer "GND" (solid, remove dead copper, pour order 0): 0,78.74 0,1692.91 cw(c78.74,1692.91) 78.74,1771.65 1771.65,1771.65 cw(c1771.65,1692.91) 1850.39,1692.91 1850.39,78.74 cw(c1771.65,78.74) 1771.65,0 78.74,0 cw(c78.74,78.74)

## Keep-outs
Keep-Out Layer:
  the board outline again, w10

## Other copper
Top Layer:
  rectangle net GND: 1559.05,607.74 1589.31,657.57
  rectangle net GND: 1317.83,630.41 1674.45,701.12
  pour cut-out: 1490.06,1099.53 1490.06,839.13 1497.47,831.72 1762.1,831.72 1762.1,1095.3 1761.05,1096.36
  pour cut-out: 1554.77,624.46 1554.77,568.92 1566.18,557.51 1654.06,557.51 1658.25,561.69 1658.25,595.55 1653.68,600.12 1572.65,600.12 1570.37,602.4 1570.37,624.85
  region net NetC3_2: 1522.95,715.03 1545.71,715.03 1549.38,718.7 1549.38,947.44 1544.24,952.58 1484.76,952.58 1475.95,943.76 1475.95,836.19 1520.38,791.76 1520.38,720.9
  region net VBUS1: 1154.47,779.45 1154.47,700.6 1159.24,695.82 1204.73,695.82 1222.56,713.89 1505.93,713.89 1510.64,718.6 1510.64,772.87 1498.53,784.99 1160,784.99

## Silkscreen, mask and mechanical layers (free items; w line width, h text height)
Top Overlay:
  text "GND" at 1246,1659.31 h35
  text "VCC" at 923.06,1656.99 h35
  text "LED1" at 21.32,1654.26 h35
  text "LED2" at 368.42,1654.26 h35
  text "PC15" at 1246,1559.25 h35
  text "PC14" at 893.91,1557.42 h35
  text "VBUS" at 13.47,1553.07 h35
  text "VCC" at 377.49,1553.07 h35
  text "PB12" at 1246,1459.19 h35
  text "PB11" at 905.57,1457.85 h35
  text "VCC" at 30.97,1453.25 h35
  text "GND" at 377.49,1453.25 h35
  text "GND" at 1362.23,1375.97 h35
  text "GND" at 1680.49,1375.97 h35
  text "PB3" at 1246,1359.13 h35
  text "PB1" at 934.73,1358.29 h35
  text "PA3" at 30.97,1353.42 h35
  text "PC18" at 377.49,1353.42 h35
  text "5V" at 1388.17,1278.2 h35
  text "VBUS1" at 1678.21,1278.2 h35
  text "PA7" at 923.06,1258.72 h35
  text "PB0" at 1246,1259.07 h35
  text "PA2" at 30.97,1253.59 h35
  text "PC19" at 377.49,1253.59 h35
  text "5V" at 1388.17,1173.44 h35
  text "VBUS1" at 1678.21,1173.44 h35
  text "PA5" at 923.06,1159.15 h35
  text "PA6" at 1246,1159.01 h35
  text "PA1" at 36.8,1153.77 h35
  text "PA4" at 377.49,1153.77 h35
  text "GND" at 923.06,1058.96 h35
  text "GND" at 1246,1058.96 h35
  text "PA0" at 30.97,1053.94 h35
  text "PC16" at 377.49,1053.94 h35
  text "VBUS1" at 865.52,956.32 h35
  text "PC15" at 16.39,954.12 h35
  text "PC17" at 377.49,954.12 h35
  text "VBUS1" at 1246,949 h35
  text "CH32X035F8U-R0-1v2" at 48.64,837.68 h35 r270
Bottom Overlay:
  drawing of 869 lines, arcs and shapes, not listed
Mechanical 1:
  the board outline again, w10

## Text inside footprints (layer, text, board x,y; h text height)
D1: Top Overlay "+" at 1049.27,621.5 h40
D3: Top Overlay "+" at 639.54,1625.58 h40 r270
D4: Top Overlay "+" at 639.54,1695.99 h40 r270
P8: Top Overlay "G" at 724.51,398.31 h40; Top Overlay "V" at 444.51,398.31 h40; Top Overlay "D+" at 614.51,398.31 h40; Top Overlay "D-" at 524.51,398.31 h40